# Altium PCB Microphone Breakout Board.PcbDoc (part 1 of 2)
Units mm, origin at the board's own origin, x right, y up, seen from the top; angles counter-clockwise.
Board outline 50 x 68.07 mm, 2 copper layers (Top Layer, Bottom Layer), stack 1.448 mm thick; 111 components, 81 nets, 324 pads, 44 vias.
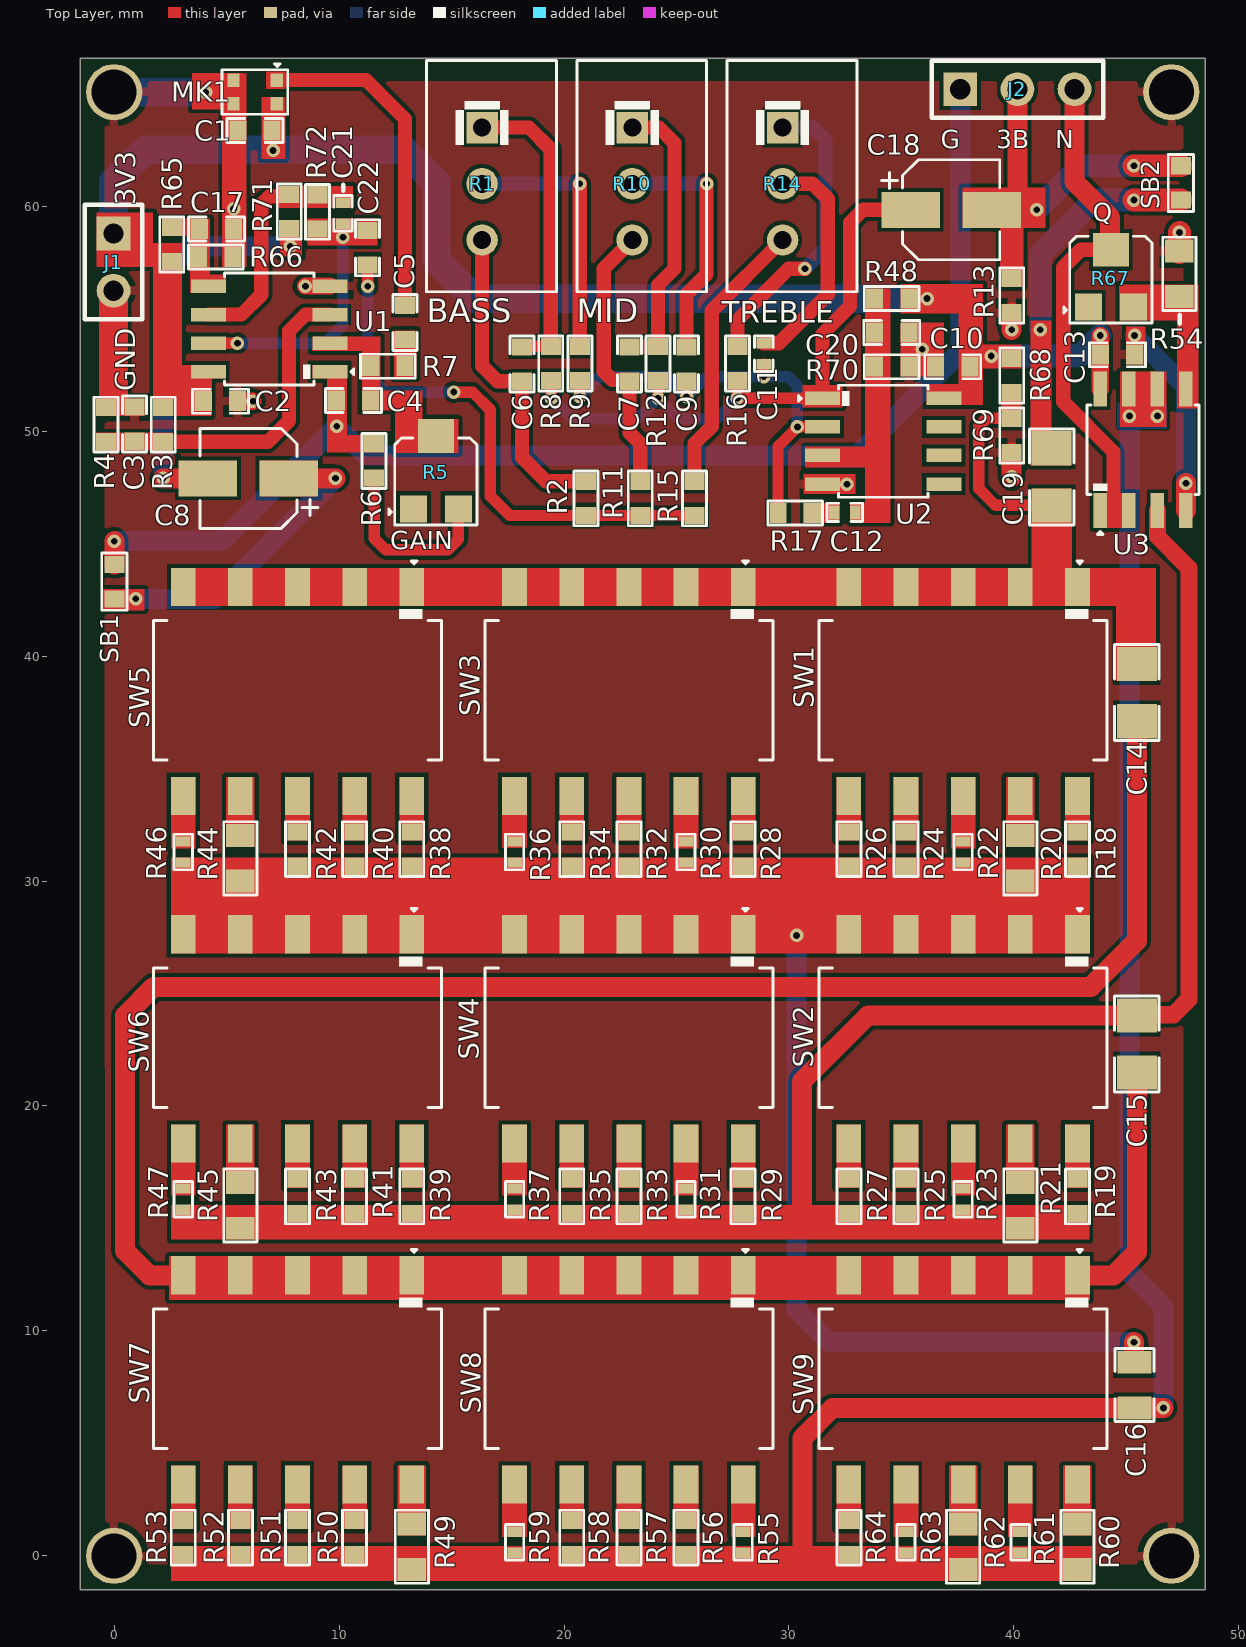
[diagram p0: Top Layer view]
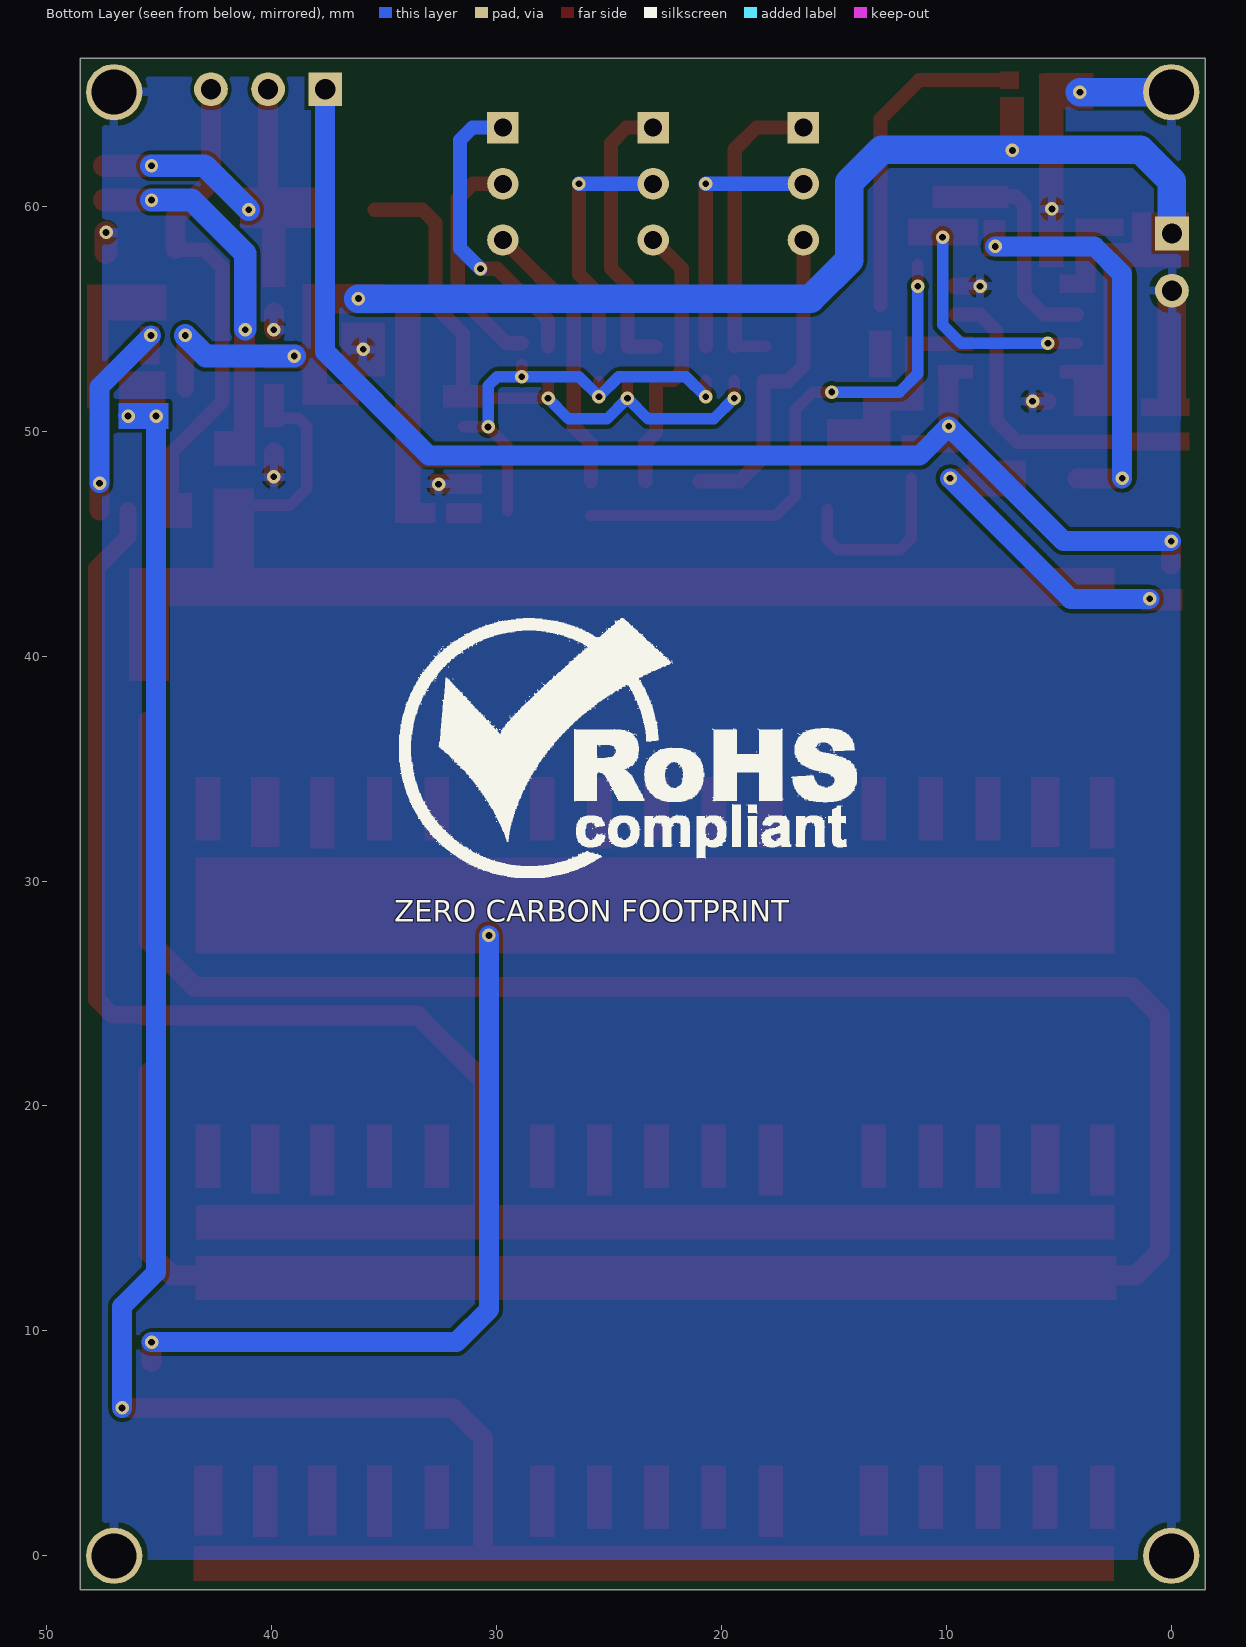
[diagram p1: Bottom Layer view, seen from below]
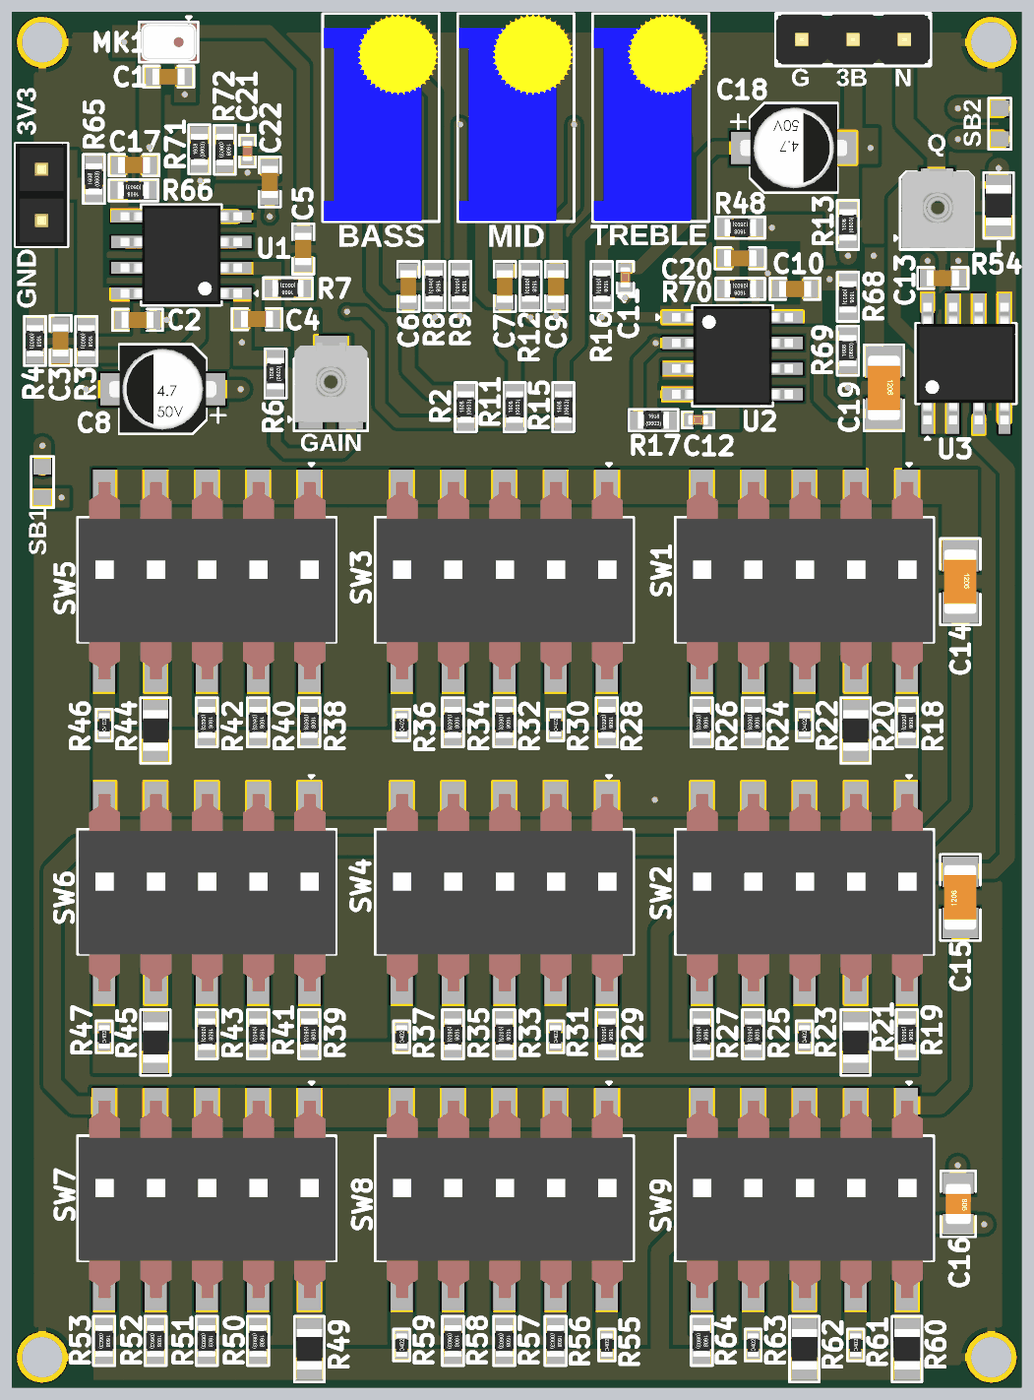
[diagram p2: 3D render of the assembled board from above, using the file's embedded part models]

## Layer stack, top to bottom
Top Solder: solder mask 0.0762, Solder Resist, Dk 3.5
Top Layer: signal copper 0.254
Dielectric 1: dielectric 0.9398, FR-4, Dk 4.8
Bottom Layer: signal copper 0.254
Bottom Solder: solder mask 0.0762, Solder Resist, Dk 3.5

## Board outline
-1.5,-1.5 -1.5,66.572 48.5,66.572 48.5,-1.5

## Design rules (kind name [scope] priority, off if disabled: settings)
Clearance [All] p1: gap=0.178 ignorepadtopadclearanceinfootprint=FALSE
ComponentClearance [All] p1: gap=0.178 collisioncheckmode=3 verticalgap=0.178 showdistances=FALSE
HoleToHoleClearance [All] p1: gap=0.178 allowstackedmicrovias=TRUE
MinimumSolderMaskSliver [All] p1: minsoldermaskwidth=0
PolygonConnect [All] p1: connectstyle=Relief reliefconductorwidth=0.381 reliefentries=4 polygonreliefangle="90 Angle" airgapwidth=0.254
RoutingVias [All] p1: holewidth=0.3 width=0.6 viastyle="Through Hole" minholewidth=0.3 minwidth=0.6 maxholewidth=0.8 maxwidth=1.6
SilkToSilkClearance [All] p1: silktosilkclearance=0
SilkToSolderMaskClearance [IsPad] p1: minsilkscreentomaskgap=0 clearancetoexposedcopper=TRUE
SolderMaskExpansion [All] p1: expansion=0.102 istentingtop=FALSE
UnRoutedNet [All] p1: checkbadconnections=TRUE
Width [All] p1: maxlimit=1.27 minlimit=0.254 preferedwidth=0.508 minimp=50.000000 maximp=50.000000 favimp=50.000000
24 further rules are at their usual default settings.

## Classes and differential pairs
component class U_Notch_Filter: C13 C14 C15 C16 C19 R18 R19 R20 R21 R22 R23 R24 R25 R26 R27 R28 R29 R30 R31 R32 R33 R34 R35 R36 R37 R38 R39 R40 R41 R42 R43 R44 R45 R46 R49 R50 R51 R52 R53 R54 R55 R56 R57 R58 R59 R60 R61 R62 R63 R64 R67 R68 R69 SW1 SW2 SW3 SW4 SW5 SW6 SW7 SW8 SW9 U3
component class U_Gain: C1 C2 C3 C4 C5 J1 J2 MK1 R3 R4 R5 R6 R7 SB1 U1
component class U_3_Band_Filter: C6 C7 C8 C9 C10 C11 C12 C17 C18 C20 C21 C22 R1 R2 R8 R9 R10 R11 R12 R13 R14 R15 R16 R17 R48 R65 R66 R70 R71 R72 SB2 U2

## Components (designator, comment, footprint, x,y, rotation, side; value= is the part's Value field where it differs from the comment)
C1 "0.1uF" CAP-0603 6.263,63.365 r180 top locked
C2 "0.1uF" CAP-0603 4.723,51.332 r0 top locked
C3 "1uF" Cap-0603 0.913,50.316 r270 top locked
C4 "47pF" Cap-0603 10.637,51.369 r180 top locked
C5 "1uF" Cap-0603 12.929,54.839 r270 top locked
C6 "47nF" Cap-0603 18.134,52.983 r90 top locked
C7 "4.7nF" Cap-0603 22.909,52.983 r270 top locked
C8 "10uF" RVT1E100M0405_ 5.971,47.903 r180 top locked
C9 "22nF" Cap-0603 25.449,52.983 r270 top locked
C10 "0.1uF" CAP-0603 37.282,52.865 r180 top locked
C11 "4.2nF" Cap-0402 28.877,53.44 r270 top locked
C12 "1.2nF" Cap-0402 32.481,46.386 r0 top locked
C13 "0.1uF" CAP-0603 44.601,53.4 r0 top locked
C14 "0.1uF" Cap-1206 45.465,38.378 r270 top locked
C15 "0.1uF" Cap-1206 45.465,22.757 r90 top locked
C16 "0.2uF" Cap-0805 45.363,7.593 r270 top locked
C17 "1uF" Cap-0603 4.545,58.988 r180 top locked
C18 "10uF" RVT1E100M0405_ 37.213,59.841 r0 top locked
C19 "4.7uF" Cap-1206 41.68,47.969 r270 top locked
C20 "1uF" Cap-0603 34.568,54.38 r180 top locked
C21 "33pF" Cap-0402 10.17,59.688 r270 top locked
C22 "2.2uF" Cap-0603 11.27,58.154 r270 top locked
J1 "22284020" HDR1X2_ -0.027,58.786 r270 top locked
J2 "C49257" HDR1X3_ 37.616,65.204 r0 top locked
MK1 "ZTS6117" ZTS6117_ 6.267,65.079 r270 top locked
R1 "100k" 3296W_ 16.356,60.999 r270 top locked
R2 "10K" Res-0603 20.979,47.014 r270 top locked value=10kR
R3 "10K" Res-0603 2.183,50.291 r90 top locked value=10kR
R4 "10K" Res-0603 -0.357,50.291 r90 top locked value=10kR
R5 "500k" VG039NCHXTB504_ 14.299,48.165 r0 top locked
R6 "1K" Res-0603 11.559,48.678 r270 top locked
R7 "10K" Res-0603 12.169,52.888 r0 top locked value=10kR
R8 "10K" Res-0603 19.411,53.008 r90 top locked value=10kR
R9 "10K" Res-0603 20.704,53.008 r90 top locked value=10kR
R10 "100k" 3296W_ 23.036,60.999 r270 top locked
R11 "3.3k" Res-0603 23.392,47.014 r270 top locked
R12 "3.3k" Res-0603 24.179,53.008 r90 top locked
R13 "22K" Res-0603 39.902,56.031 r270 top locked
R14 "500k" 3296W_ 29.717,60.999 r270 top locked
R15 "1.8K" Res-0603 25.805,47.014 r270 top locked
R16 "1.8K" Res-0603 27.71,53.008 r90 top locked
R17 "270R" Res-0603 30.273,46.367 r180 top locked
R18 "80K" Res-0603 42.823,31.418 r90 top locked
R19 "80K" Res-0603 42.823,15.984 r90 top locked
R20 "40K" RES-0805 40.283,31.012 r90 top locked
R21 "40K" RES-0805 40.283,15.578 r90 top locked
R22 "27K" Res-0402 37.743,31.291 r90 top locked
R23 "27K" Res-0402 37.743,15.857 r90 top locked
R24 "20K" Res-0603 35.203,31.418 r90 top locked
R25 "20K" Res-0603 35.203,15.984 r90 top locked
R26 "16K" Res-0603 32.663,31.418 r90 top locked
R27 "16K" Res-0603 32.663,15.984 r90 top locked
R28 "8.2K" Res-0603 27.964,31.418 r90 top locked value=8.2kR
R29 "8.2K" Res-0603 27.964,15.984 r90 top locked value=8.2kR
R30 "4.02K" Res-0402 25.424,31.291 r90 top locked
R31 "4.02K" Res-0402 25.424,15.857 r90 top locked
R32 "2.7K" Res-0603 22.884,31.418 r90 top locked
R33 "2.7K" Res-0603 22.884,15.984 r90 top locked
R34 "2K" Res-0603 20.344,31.418 r90 top locked
R35 "2K" Res-0603 20.344,15.984 r90 top locked
R36 "1.6K" Res-0402 17.804,31.291 r90 top locked
R37 "1.6K" Res-0402 17.804,15.857 r90 top locked
R38 "1.3K" Res-0603 13.232,31.418 r90 top locked
R39 "1.3K" Res-0603 13.232,15.984 r90 top locked
R40 "1.1K" Res-0603 10.692,31.418 r90 top locked
R41 "1.1K" Res-0603 10.692,15.984 r90 top locked
R42 "1K" Res-0603 8.152,31.418 r90 top locked
R43 "1K" Res-0603 8.152,15.984 r90 top locked
R44 "900R" RES-0805 5.612,31.012 r90 top locked
R45 "900R" RES-0805 5.612,15.578 r90 top locked
R46 "806R" Res-0402 3.072,31.291 r90 top locked
R47 "806R" Res-0402 3.072,15.857 r90 top locked
R48 "10K" Res-0603 34.568,55.895 r0 top locked value=10kR
R49 "40K" RES-0805 13.232,0.405 r90 top locked
R50 "20K" Res-0603 10.692,0.811 r90 top locked
R51 "13.3K" Res-0603 8.152,0.811 r90 top locked
R52 "10K" Res-0603 5.612,0.811 r90 top locked value=10kR
R53 "8.2K" Res-0603 3.072,0.811 r90 top locked value=8.2kR
R54 "98K" RES-0805 47.357,56.996 r90 top
R55 "4.02K" Res-0402 27.964,0.608 r90 top locked
R56 "2K" Res-0603 25.424,0.811 r90 top locked
R57 "1.3K" Res-0603 22.884,0.811 r90 top locked
R58 "1K" Res-0603 20.344,0.811 r90 top locked
R59 "806R" Res-0402 17.804,0.608 r90 top locked
R60 "649R" RES-0805 42.823,0.405 r90 top locked
R61 "549R" Res-0402 40.283,0.608 r90 top locked
R62 "500R" RES-0805 37.743,0.405 r90 top locked
R63 "453R" Res-0402 35.203,0.608 r90 top locked
R64 "402R" Res-0603 32.663,0.811 r90 top locked
R65 "10K" Res-0603 2.564,58.302 r270 top locked value=10kR
R66 "10K" Res-0603 4.52,57.743 r0 top locked value=10kR
R67 "100k" TC33X-2-104E_ 43.309,55.513 r0 top locked
R68 "10K" Res-0603 39.902,52.475 r90 top locked value=10kR
R69 "10K" Res-0603 39.902,49.808 r270 top locked value=10kR
R70 "10K" Res-0603 34.568,52.865 r0 top locked value=10kR
R71 "47K" Res-0603 7.784,59.765 r270 top locked
R72 "47K" Res-0603 9.04,59.75 r90 top locked
SB1 "Solder Bridge" "Solder Bridge" 0.01,43.307 r270 top locked
SB2 "Solder Bridge" "Solder Bridge" 47.422,61.036 r270 top locked
SW1 "DSIC05LS-P" DSIC05LS-P_ 37.743,38.427 r270 top locked
SW2 "DSIC05LS-P" DSIC05LS-P_ 37.743,22.986 r270 top locked
SW3 "DSIC05LS-P" DSIC05LS-P_ 22.884,38.427 r270 top locked
SW4 "DSIC05LS-P" DSIC05LS-P_ 22.884,22.986 r270 top locked
SW5 "DSIC05LS-P" DSIC05LS-P_ 8.152,38.427 r270 top locked
SW6 "DSIC05LS-P" DSIC05LS-P_ 8.152,22.986 r270 top locked
SW7 "DSIC05LS-P" DSIC05LS-P_ 8.152,7.82 r270 top locked
SW8 "DSIC05LS-P" DSIC05LS-P_ 22.884,7.82 r270 top locked
SW9 "DSIC05LS-P" DSIC05LS-P_ 37.743,7.82 r270 top locked
U1 "LM2904DT" SOIC-8 6.892,54.547 r180 top locked
U2 "LM2904DT" SOIC-8 34.187,49.554 r0 top locked
U3 "LM2904DT" SOIC-8 45.744,49.173 r90 top locked

## Footprints (in the part's own frame and the unit in brackets; to place one, negate y for a bottom-side part, rotate by r counter-clockwise, add the part's x,y. Pads: shape width x height; smd on the part's side, far side on the other; paste and mask are expansions set on the pad)
3296W_ [mm]
  rect 1.4x1.4 hole 0.8: 1(-2.5,0)
  round 1.4 hole 0.8: 2(0,0) 3(2.5,0)
  silkscreen extent -5.49,-2.46 4.8,3.3, body extent -5.47,-2.41 4.76,3.27, height 18.03
Cap-0402 [mil]
  rect 18x25 smd mask+2.36: 1(-18.5,0) 2(18.5,0)
  silkscreen extent -31,-16 31,16, body extent -20,-10 20,10, height 19
CAP-0603 [mil]
  rect 30x35 smd mask+2.36: 1(-30,0) 2(30,0)
  silkscreen extent -49,-21 49,21, body extent -32,-16 31,16, height 34
Cap-0603 [mil]
  rect 30x35 smd mask+2.36: 1(-30,0) 2(30,0)
  silkscreen extent -49,-21 49,21, body extent -32,-16 31,16, height 34
Cap-0805 [mil] "SMD 0805"
  rect 40x60 smd mask+2.76: 1(-40,0) 2(40,0)
  silkscreen extent -64,-34 64,34, body extent -39,-25 39,25, height 30
Cap-1206 [mil] "SMD 1206"
  rect 60x70 smd: 1(-50,0) 2(50,0)
  silkscreen extent -84,-39 84,39, body extent -63,-31 63,32, height 39
DSIC05LS-P_ [mm]
  rect 1.7x1.1 smd: 1(-4.65,5.08) 2(-4.65,2.54) 3(-4.65,0) 4(-4.65,-2.54) 5(-4.65,-5.08) 6(4.65,-5.08) 7(4.65,-2.54) 8(4.65,0) 9(4.65,2.54) 10(4.65,5.08)
  silkscreen extent -5.8,-6.4 3.05,6.4, body extent -4.88,-6.33 4.88,6.37, height 4.15
HDR1X2_ [mm] "CONN HEADER VERT 2POS 2.54MM"
  rect 1.5x1.5 hole 0.9: 1(0,0)
  round 1.5 hole 0.9: 2(2.54,0)
  silkscreen extent -1.27,-1.27 3.81,1.27, body extent -1.27,-1.27 3.81,1.27, height 8.44
HDR1X3_ [mm] "Connector; Header; 3 Position"
  rect 1.5x1.5 hole 0.9: 1(0,0)
  round 1.5 hole 0.9: 2(2.54,0) 3(5.08,0)
  silkscreen extent -1.27,-1.27 6.35,1.27, body extent -1.27,-1.24 6.35,1.25, height 8.54
Res-0402 [mil]
  rect 18x25 smd mask+2.17: 1(-18.5,0) 2(18.5,0)
  silkscreen extent -32,-17 32,16, body extent -23,-11 23,11, height 16
Res-0603 [mil]
  rect 30x35 smd: 1(-30,0) 2(30,0)
  silkscreen extent -48,-21 48,21, body extent -31,-17 31,17, height 18
RES-0805 [mil] "SMD 0805"
  rect 40x50 smd: 1(-40,0) 2(40,0)
  silkscreen extent -64,-29 64,29, body extent -39,-25 39,24, height 24
RVT1E100M0405_ [mm] "10uF 25V 5.4mm SMD"
  rect 2.6x1.6 smd: 1(-1.8,0) 2(1.8,0)
  silkscreen extent -3.1,-2.22 2.16,2.22, body extent -2.65,-2.15 2.65,2.15, height 5.7
SOIC-8 [mm]
  rect 1.55x0.6 smd: 1(-2.7,1.905) 2(-2.7,0.635) 3(-2.7,-0.635) 4(-2.7,-1.905) 5(2.7,-1.905) 6(2.7,-0.635) 7(2.7,0.635) 8(2.7,1.905)
  silkscreen extent -3.76,-2.49 1.99,2.49, body extent -3,-2.45 3,2.45, height 1.7
"Solder Bridge" [mil] "Solder Bridge ON"
  rect 30x35 smd: 1(-30,0) 2(30,0)
  silkscreen extent -50,-22 50,22
TC33X-2-104E_ [mm]
  rect 1.2x1.2 smd: 1(0,0) 3(2,0)
  rect 1.6x1.5 smd: 2(1,2.55)
  silkscreen extent -1.09,-0.71 2.83,3.15, body extent -0.76,-0.64 2.84,3.32, height 1.13
VG039NCHXTB504_ [mm]
  rect 1.2x1.2 smd: 1(-1,-1.625) 3(1,-1.625)
  rect 1.6x1.5 smd: 2(0,1.625)
  silkscreen extent -2.09,-2.33 1.83,1.53, body extent -1.8,-1.91 1.8,2.05, height 1.13
ZTS6117_ [mm]
  rect 0.6x0.54 smd: 1(-0.525,0.965) 2(-0.525,-0.965) 3(0.525,-0.965) 4(0.525,0.965)
  silkscreen extent -1.25,-1.47 0.99,1.45, body extent -0.92,-1.38 0.93,1.38, height 0.9

## Part data
C1 C2 C10 C13: library part CL10B104KB8NNNL, "CAP CER 0.1UF 50V X7R 0603", Capacitance=100nF, Case/Package=0603, Dielectric=X7R, LCSC Part Number=C913912, Manufacturer=Samsung, Max Operating Temperature=125°C, Min Operating Temperature=-55°C, Package Quantity=15000, Supplier Part Number 1=1276-CL10B104KB8NNNLCT-ND, Tolerance=10%, Voltage Rating=50V, ComponentLink1Description=https://www.verical.com/server-webapp/html/getDatasheet?partID=357523&src-supplier=Verical, ComponentLink1URL=https://www.verical.com/server-webapp/html/getDatasheet?partID=357523&src-supplier=Verical, ComponentLink2Description=https://media.digikey.com/pdf/Data%20Sheets/Samsung%20PDFs/CL_Series_MLCC_ds.pdf?src-supplier=Digi-Key, ComponentLink2URL=https://media.digikey.com/pdf/Data%20Sheets/Samsung%20PDFs/CL_Series_MLCC_ds.pdf?src-supplier=Digi-Key, Construction=Flat, Depth=0.8mm, Height=0.8mm, Length=1.6mm, Manufacturer Part Number=CL10B104KB8NNNL, Mount="Surface Mount", Packaging="Tape and Reel", Pricing 1="1=0.1, 10=0.03, 50=0.0164, 100=0.0134, 500=0.00958, 1000=0.00753, 2500=0.00684, 5000=0.0063 (USD)", Radiation Hardening=No, RoHS Compliant=Yes, Series=CL, Stock 1=3731229, Supplier 1=Digi-Key, Thickness=0.035inch, Voltage Rating (DC)=50V, Width=0.031inch
C3 C5 C17 C20: library part UMK107AB7105KA-T, "CAP CER 1UF 50V X7R 0603", Case Code (Imperial)=0603, Case Code (Metric)=1608, Dielectric=X7R, LCSC Part Number=C105174, Manufacturer="Taiyo Yuden", Max Operating Temperature=125°C, Min Operating Temperature=-55°C, Package Quantity=1, Supplier Part Number 1=587-3247-1-ND, Tolerance=10%, Voltage Rating=50V, Capacitance=1uF, Case/Package=0603, ComponentLink1Description=http://www.farnell.com/datasheets/2048165.pdf?src-supplier=Element14, ComponentLink1URL=http://www.farnell.com/datasheets/2048165.pdf?src-supplier=Element14, ComponentLink2Description=https://www.murata.com/~/media/webrenewal/support/library/catalog/products/capacitor/mlcc/c02e.ashx?la=en-us&src-supplier=Digi-Key, ComponentLink2URL=https://www.murata.com/~/media/webrenewal/support/library/catalog/products/capacitor/mlcc/c02e.ashx?la=en-us&src-supplier=Digi-Key, ComponentLink3Description=https://www.yuden.co.jp/productdata/catalog/mlcc_all_e.pdf?src-supplier=Digi-Key, ComponentLink3URL=https://www.yuden.co.jp/productdata/catalog/mlcc_all_e.pdf?src-supplier=Digi-Key, ComponentLink4Description=https://www.yuden.co.jp/productdata/catalog/mlcc_all_e.pdf?src-supplier=Onlinecomponents.com, ComponentLink4URL=https://www.yuden.co.jp/productdata/catalog/mlcc_all_e.pdf?src-supplier=Onlinecomponents.com, Depth=0.8mm, Halogen Free="Halogen Free", Height=0.8mm, Item Type=Capacitor, Length=1.6mm, Manufacturer Part Number=UMK107AB7105KA-T, Mount="Surface Mount", Packaging="Tape and Reel", Pricing 1="1=0.28, 10=0.19, 100=0.1079, 500=0.0762, 1000=0.0667 (USD)", Radiation Hardening=No, Stock 1=453098, Supplier 1=Digi-Key, Termination=SMD/SMT, Thickness=0.037inch, Voltage Rating (DC)=50V, Width=0.031inch
C4: library part AC0603JRNPO0BN470, "CAP CER 47PF 100V NPO 0603", Case Code (Imperial)=0603, Case Code (Metric)=1608, Case/Package=TO-236-3, LCSC Part Number=C389107, Manufacturer=Yageo, Max Operating Temperature=125°C, Max Power Dissipation=250mW, Min Operating Temperature=-55°C, Ratings=AEC-Q200, Supplier Part Number 1=311-3086-1-ND, Tolerance=6.06%, Voltage Rating=100V, Zener Voltage=33V, Capacitance=47pF, ComponentLink1Description=http://www.yageo.com/NewPortal/_en/search/productDocs.jsp?YageoPartNumber=AC0603JRNPO0BN470&src-supplier=Digi-Key, ComponentLink1URL=http://www.yageo.com/NewPortal/_en/search/productDocs.jsp?YageoPartNumber=AC0603JRNPO0BN470&src-supplier=Digi-Key, Impedance=80R, Item Type=Capacitor, Manufacturer Part Number=AC0603JRNPO0BN470, Mount="Surface Mount", Packaging="Tape and Reel", Pricing 1="1=0.16, 10=0.115, 100=0.0542, 500=0.03798, 1000=0.03144 (USD)", Stock 1=4954, Supplier 1=Digi-Key
C6: library part CGA3E2X8R1H473M080AA, "CAP CER 0.047UF 50V X8R 0603", Case Code (Imperial)=0603, Case Code (Metric)=1608, Dielectric=X8R, LCSC Part Number=C2172709, Manufacturer=TDK, Max Operating Temperature=150°C, Min Operating Temperature=-55°C, Package Quantity=4000, Ratings=AEC-Q200, Supplier Part Number 1=445-12603-1-ND, Tolerance=20%, Voltage Rating=50V, Capacitance=47nF, Case/Package=0603, Category="Ceramic Capacitors", ComponentLink1Description=http://www.mouser.com/ds/2/400/mlcc_automotive_hightemp_en-520039.pdf?src-supplier=Mouser, ComponentLink1URL=http://www.mouser.com/ds/2/400/mlcc_automotive_hightemp_en-520039.pdf?src-supplier=Mouser, ComponentLink2Description=https://product.tdk.com/info/en/catalog/spec/mlccspec_automotive_hightemp_en.pdf?src-supplier=Digi-Key, ComponentLink2URL=https://product.tdk.com/info/en/catalog/spec/mlccspec_automotive_hightemp_en.pdf?src-supplier=Digi-Key, ComponentLink3Description=http://product.tdk.com/en/catalog/datasheets/mlcc_automotive_hightemp_en.pdf?src-supplier=Avnet, ComponentLink3URL=http://product.tdk.com/en/catalog/datasheets/mlcc_automotive_hightemp_en.pdf?src-supplier=Avnet, Features="High Temperature", Height=0.8mm, Length=0.063inch, Manufacturer Part Number=CGA3E2X8R1H473M080AA, Mount="Surface Mount", Packaging="Tape and Reel", Pricing 1="1=0.16000, 10=0.11200, 50=0.06360, 100=0.05260, 500=0.03690, 1000=0.03055 (USD)", RoHS=Yes, Stock 1=1279, Supplier 1=Digi-Key, Thickness=0.035inch, Voltage Rating (DC)=50V, Weight=7.1E-05oz, Width=0.031inch
C7: library part CC0603JRNPO9BN472, "CAP CER 4700PF 50V C0G/NPO 0603", LCSC Part Number=C576818, Manufacturer=Yageo, Supplier Part Number 1=13-CC0603JRNPO9BN472CT-ND, Category="Ceramic Capacitors", ComponentLink1Description=LCSC, ComponentLink1URL=https://www.lcsc.com/product-detail/Multilayer-Ceramic-Capacitors-MLCC-SMD-SMT_YAGEO-CC0603JRNPO9BN472_C576818.html, Item Type=Capacitor, Manufacturer Part Number=CC0603JRNPO9BN472, Pricing 1="1=0.48000, 10=0.33000, 50=0.23100, 100=0.19800, 500=0.14854, 1000=0.12543 (USD)", RoHS=Yes, RoHS Compliant=Yes, Stock 1=31779, Supplier 1=Digi-Key
C8 C18: library part RVT1E100M0405, "CAP ALUM 10uF 25V SMD", LCSC Part Number=C970655, Manufacturer=ROQANG, Operating Temperature=-45℃~+105℃, Rated Voltage=25V, Tolerance=±20%, Capacitance=10uF, ComponentLink1Description=LCSC, ComponentLink1URL=https://www.lcsc.com/product-detail/Aluminum-Electrolytic-Capacitors-SMD_10uF-25V-20_C72484.html, Item Type=Capacitor, L=5.4mm, Manufacturer Part Number=RVT1E100M0405, φD=4mm
C9: library part CGA3E2X7R2A223K080AA, "CAP CER 0.022UF 100V X7R 0603", Case Code (Imperial)=0603, Case Code (Metric)=1608, Dielectric=X7R, LCSC Part Number=C2167165, Manufacturer=TDK, Max Operating Temperature=125°C, Min Operating Temperature=-55°C, Package Quantity=1, Ratings=AEC-Q200, Resistor Type=Ceramic, Supplier Part Number 1=445-5814-1-ND, Tolerance=10%, Voltage Rating=100V, Capacitance=22nF, Case/Package=0603, Category="Ceramic Capacitors", ComponentLink1Description=https://datasheet.ciiva.com/22725/1735406-22725648.pdf?src-supplier=Element14, ComponentLink1URL=https://datasheet.ciiva.com/22725/1735406-22725648.pdf?src-supplier=Element14, ComponentLink2Description=https://datasheet.ciiva.com/24218/cga3e2x7r2a223k080aa-266292-24218959.pdf?src-supplier=Mouser, ComponentLink2URL=https://datasheet.ciiva.com/24218/cga3e2x7r2a223k080aa-266292-24218959.pdf?src-supplier=Mouser, ComponentLink3Description=https://datasheet.ciiva.com/7975/1807242-7975349.pdf?src-supplier=Element14, ComponentLink3URL=https://datasheet.ciiva.com/7975/1807242-7975349.pdf?src-supplier=Element14, Depth=0.8mm, Height=0.8mm, Length=1.6mm, Manufacturer Part Number=CGA3E2X7R2A223K080AA, Mount="Surface Mount", Packaging="Tape and Reel", Pricing 1="1=0.11000, 10=0.07600, 50=0.04340, 100=0.03590, 500=0.02516, 1000=0.02083 (USD)", REACH SVHC="No SVHC", RoHS=Yes, RoHS Compliant=Yes, Series=CGA, Stock 1=56079, Supplier 1=Digi-Key, Termination=SMD/SMT, Thickness=0.035inch, Voltage Rating (DC)=100V, Weight=7.1E-05oz, Width=0.031inch
C11: library part GCM155R72A472KA01D, "100V 4.2nF X7R ±10% 0402 Multilayer Ceramic Capacitors MLCC - SMD/SMT ROHS", LCSC Part Number=C2980803, Manufacturer="Murata Electronics", ComponentLink1Description=LCSC, ComponentLink1URL=https://www.lcsc.com/product-detail/Multilayer-Ceramic-Capacitors-MLCC-SMD-SMT_Murata-Electronics-GCM155R72A472KA01D_C2980803.html, Item Type=Capacitor, Manufacturer Part Number=GCM155R72A472KA01D
C12: library part C0402C122K3RAC7867, "CAP CER 1200PF 25V X7R 0402", Case/Package=0402, Dielectric=X7R, Dielectric Material=Ceramic, LCSC Part Number=C3895723, Manufacturer=KEMET, Max Operating Temperature=125°C, Min Operating Temperature=-55°C, Supplier Part Number 1=399-14419-1-ND, Tolerance=10%, Voltage Rating (DC)=25V, Capacitance=1.2nF, Construction=Flat, Contact Plating=Tin,Matte, Depth=0.5mm, Height=0.5mm, Length=1mm, Manufacturer Part Number=C0402C122K3RAC7867, Mount="Surface Mount", Packaging="Tape and Reel", Pricing 1="1=0.38, 10=0.266, 50=0.1864, 100=0.1597, 500=0.1198, 1000=0.10117, 2500=0.09584, 5000=0.09052 (USD)", Radiation Hardening=No, RoHS Compliant=Yes, Stock 1=13198, Supplier 1=Digi-Key
C14 C15: library part GRM31C5C1H104FA01L, "50V 100nF C0G ±1% 1206 Multilayer Ceramic Capacitors MLCC - SMD/SMT ROHS", LCSC Part Number=C2981728, Manufacturer="Murata Electronics", ComponentLink1Description=LCSC, ComponentLink1URL=https://www.lcsc.com/product-detail/Multilayer-Ceramic-Capacitors-MLCC-SMD-SMT_Murata-Electronics-GRM31C5C1H104FA01L_C2981728.html, Item Type=Capacitor, Manufacturer Part Number=GRM31C5C1H104FA01L
C16: library part NL0805B204K500CPBN, "50V 200nF ±10% 0805 Multilayer Ceramic Capacitors MLCC - SMD/SMT ROHS", LCSC Part Number=C918135, Manufacturer="HUI JU", ComponentLink1Description=LCSC, ComponentLink1URL=https://www.lcsc.com/product-detail/Multilayer-Ceramic-Capacitors-MLCC-SMD-SMT_HUI-JU-NL0805B204K500CPBN_C918135.html, Item Type=Capacitor, Manufacturer Part Number=NL0805B204K500CPBN
C19: library part C3216X7R1H475K160AC, "CAP CER 4.7UF 50V X7R 1206", Case Code (Imperial)=1206, Case Code (Metric)=3216, Dielectric=X7R, Dielectric Material=Ceramic, LCSC Part Number=C2167787, Manufacturer=TDK, Max Operating Temperature=125°C, Min Operating Temperature=-55°C, Package Quantity=1, Supplier Part Number 1=445-8032-1-ND, Tolerance=10%, Voltage Rating=50V, Capacitance=4.7uF, Case/Package=1206, ComponentLink1Description=https://product.tdk.com/info/en/catalog/datasheets/mlcc_commercial_general_en.pdf?src-supplier=Digi-Key, ComponentLink1URL=https://product.tdk.com/info/en/catalog/datasheets/mlcc_commercial_general_en.pdf?src-supplier=Digi-Key, ComponentLink2Description=http://www.mouser.com/ds/2/400/lcc_commercial_general_en-560200.pdf?src-supplier=Mouser, ComponentLink2URL=http://www.mouser.com/ds/2/400/lcc_commercial_general_en-560200.pdf?src-supplier=Mouser, ComponentLink3Description=http://product.tdk.com/capacitor/mlcc/en/documents/mlcc_commercial_general_en.pdf?src-supplier=Future+Electronics, ComponentLink3URL=http://product.tdk.com/capacitor/mlcc/en/documents/mlcc_commercial_general_en.pdf?src-supplier=Future+Electronics, Depth=1.6mm, Lead Free="Lead Free", Length=3.2mm, Manufacturer Part Number=C3216X7R1H475K160AC, Mount="Surface Mount", Packaging="Tape and Reel", Pricing 1="1=0.76, 10=0.535, 50=0.4042, 100=0.3521, 500=0.26082, 1000=0.2217 (USD)", REACH SVHC="No SVHC", Resistor Type=Ceramic, RoHS Compliant=Yes, Series=C, Stock 1=93848, Supplier 1=Digi-Key, Termination=SMD/SMT, Thickness=1.6mm, Voltage Rating (DC)=50V, Weight=0.000571oz, Width=0.063inch
C21: library part GRM1555C1E330JA01D, "CAP CER 33PF 25V C0G/NP0 0402", Case Code (Imperial)=0402, Case Code (Metric)=1005, Dielectric=C0G, LCSC Part Number=C441758, Manufacturer=Murata, Max Operating Temperature=125°C, Min Operating Temperature=-55°C, Package Quantity=1, Supplier Part Number 1=490-6177-1-ND, Tolerance=5%, Voltage=25V, Capacitance=33pF, Case/Package=0402, ComponentLink1Description=https://www.murata.com/~/media/webrenewal/support/library/catalog/products/capacitor/mlcc/c02e.ashx?la=en-us&src-supplier=Digi-Key, ComponentLink1URL=https://www.murata.com/~/media/webrenewal/support/library/catalog/products/capacitor/mlcc/c02e.ashx?la=en-us&src-supplier=Digi-Key, ComponentLink2Description=http://www.mouser.com/ds/2/281/c02e-2905.pdf?src-supplier=Mouser, ComponentLink2URL=http://www.mouser.com/ds/2/281/c02e-2905.pdf?src-supplier=Mouser, ComponentLink3Description=http://psearch.murata.com/capacitor/product/GRM1555C1E330JA01%23.pdf?src-supplier=Avnet, ComponentLink3URL=http://psearch.murata.com/capacitor/product/GRM1555C1E330JA01%23.pdf?src-supplier=Avnet, Construction=Flat, Depth=0.5mm, Height=0.5mm, Lead Free="Lead Free", Length=1mm, Manufacturer Part Number=GRM1555C1E330JA01D, Mount="Surface Mount", Packaging="Tape and Reel", Pricing 1="1=0.1, 10=0.034, 50=0.0184, 100=0.0151, 500=0.01078, 1000=0.00847, 2500=0.0077, 5000=0.00708 (USD)", Radiation Hardening=No, RoHS Compliant=Yes, Series=GRM, Stock 1=250773, Supplier 1=Digi-Key, Termination=SMD/SMT, Thickness=0.022inch, Voltage Rating=25V, Voltage Rating (DC)=25V, Width=0.02inch
C22: library part GRM188R6YA225KA12D, "CAP, 2.2µF, 35V, 10%, X5R, 0603", Case Code (Imperial)=0603, Case Code (Metric)=1608, Dielectric=X5R, LCSC Part Number=C86017, Manufacturer=Murata, Max Operating Temperature=85°C, Min Operating Temperature=-55°C, Package Quantity=4000, Supplier Part Number 1=490-7204-1-ND, Tolerance=10%, Voltage=35V, Capacitance=2.2uF, Case/Package=0603, Category="Ceramic Capacitors", ComponentLink1Description=https://datasheet.ciiva.com/14906/partnumbering-e-01-14906490.pdf?src-supplier=Digi-Key, ComponentLink1URL=https://datasheet.ciiva.com/14906/partnumbering-e-01-14906490.pdf?src-supplier=Digi-Key, ComponentLink2Description=https://datasheet.ciiva.com/14906/partnumbering-e-01-14906491.pdf?src-supplier=Digi-Key, ComponentLink2URL=https://datasheet.ciiva.com/14906/partnumbering-e-01-14906491.pdf?src-supplier=Digi-Key, ComponentLink3Description=https://datasheet.ciiva.com/14906/partnumbering-e-01-14906492.pdf?src-supplier=Digi-Key, ComponentLink3URL=https://datasheet.ciiva.com/14906/partnumbering-e-01-14906492.pdf?src-supplier=Digi-Key, Depth=0.8mm, Height=0.8mm, Lead Free="Lead Free", Length=1.6mm, Manufacturer Part Number=GRM188R6YA225KA12D, Material=Ceramic, Mount="Surface Mount", Packaging="Tape and Reel", Pricing 1="1=0.21000, 10=0.14100, 50=0.08480, 100=0.07170, 500=0.04904, 1000=0.04338 (USD)", REACH SVHC="No SVHC", RoHS=Yes, RoHS Compliant=Yes, Series=GRM, Stock 1=81665, Supplier 1=Digi-Key, Termination=SMD/SMT, Thickness=0.035inch, Voltage Rating=35V, Voltage Rating (DC)=35V, Weight=0.000222oz, Width=0.8mm
J1: "KK 254 Breakaway Header, Vertical, 2 Circuits, Tin (Sn) Plating, Mating Pin Length 6.09mm", Color=Black, Contact Resistance=20mR, Current Rating=4A, Flammability Rating="UL94 V-0", LCSC Part Number=C234182, Manufacturer=Molex, Manufacturer Part Number=22-28-4020, Max Operating Temperature=75°C, Max Voltage Rating (AC)=250V, Min Operating Temperature=0°C, Package Quantity=1, Supplier Part Number 1=8967620, Category="Headers and Wire Housings", ComponentLink1Description=https://datasheet.ciiva.com/1433/1596842-1433683.pdf?src-supplier=Element14, ComponentLink1URL=https://datasheet.ciiva.com/1433/1596842-1433683.pdf?src-supplier=Element14, ComponentLink2Description=https://datasheet.ciiva.com/5157/0022284020-pcb-headers-228358-5157523.pdf?src-supplier=Mouser, ComponentLink2URL=https://datasheet.ciiva.com/5157/0022284020-pcb-headers-228358-5157523.pdf?src-supplier=Mouser, ComponentLink3Description=https://datasheet.ciiva.com/30153/214440022284020-pcb-headers-30153261.pdf?src-supplier=Onlinecomponents.com, ComponentLink3URL=https://datasheet.ciiva.com/30153/214440022284020-pcb-headers-30153261.pdf?src-supplier=Onlinecomponents.com, ComponentLink4Description=https://datasheet.ciiva.com/15217/getdatasheetpartid-127875-15217702.pdf?src-supplier=Verical, ComponentLink4URL=https://datasheet.ciiva.com/15217/getdatasheetpartid-127875-15217702.pdf?src-supplier=Verical, ComponentLink5Description=https://datasheet.ciiva.com/10088/0022284020-pcb-headers-10088332.pdf?src-supplier=Avnet, ComponentLink5URL=https://datasheet.ciiva.com/10088/0022284020-pcb-headers-10088332.pdf?src-supplier=Avnet, Connector Type="Male Pin", Contact Material=Brass,Bronze, Contact Mating Length=0.24inch, Contact Plating=Tin, Contact Type="Male Pin", Depth=2.49mm, Gender=Male, Glow Wire Compliant=Non-compliant, Housing Color=Black, Housing Material=Nylon, Item Type=Header, Lead Free="Lead Free", Max Voltage Rating (DC)=250V, Mount="Through Hole", Number of Circuits=2, Number of Contacts=2, Number of Positions=2, Number of Rows=1, Orientation=Straight, Packaging=Bulk, Pitch=2.54mm, Pricing 1="50=0.06100, 150=0.05600, 250=0.05200, 500=0.04900 (GBP)", Radiation Hardening=No, RoHS=Yes, RoHS Compliant=Yes, Series="KK® 42375", Stock 1=29550, Supplier 1=Rs, Termination=Solder, Voltage Rating=250V, Voltage Rating (DC)=250V
J2: "3A Straight Square Pins -40℃~+105℃ 3 2.54mm Black 1x3P Plugin,P=2.54mm Pin Headers ROHS", Manufacturer=BOOMELE, ComponentLink1Description=LCSC, ComponentLink1URL=https://www.lcsc.com/product-detail/Pin-Headers_BOOMELE-Boom-Precision-Elec-C49257_C49257.html, Item Type=Header, LCSC Part Number=C49257, Manufacturer Part Number=C49257
MK1: "1.5V~3.6V Omnidirectional 120uA -42dB 400Ω 59dB SMD-4P,1.9x2.8mm MEMS Microphones ROHS", LCSC Part Number=C481300, Manufacturer=Zilltek, ComponentLink1Description=LCSC, ComponentLink1URL=https://www.lcsc.com/product-detail/MEMS-Microphones_ZILLTEK-ZTS6117_C481300.html, Item Type=Microphone, Manufacturer Part Number=ZTS6117
R1 R10: library part 3296W-1-104, "Trimmer, Cermet, Rest 100 Kilohms, PCB, 25 Turns, Pwr-Rtg 0.5W, 3296 Series", LCSC Part Number=C330435, Manufacturer="BOCHEN(Chengdu Guosheng Tech)", ComponentLink1Description=LCSC, ComponentLink1URL=https://www.lcsc.com/product-detail/Variable-Resistors-Potentiometers_BOCHEN-Chengdu-Guosheng-Tech-3296W-1-104_C330435.html, Item Type=Potentiometer, Manufacturer Part Number=3296W-1-104
R2 R3 R4 R7 R8 R9 R48 R52 R65 R66 R68 R69 R70: library part RT0603BRD0710KL, "RES SMD 10K OHM 0.1% 1/10W 0603", Case/Package=0603, LCSC Part Number=C95204, Manufacturer=Yageo, Max Operating Temperature=155°C, Min Operating Temperature=-55°C, Package Height=0.45mm, Package Length=1.6mm, Package Style=SMTMeter, Package Width=0.8mm, Power=100mW, Rated Temperature=70°C, Resistor Type="FIXED RESISTOR", Supplier Part Number 1=1991391P, Temperature Coefficient=25ppm/°C, Tolerance=0.1%, Working Voltage=75V, Category="Chip SMD Resistors", ComponentLink1Description=https://datasheet.ciiva.com:443/pdfs/VipMasterIC/IC/YAGO/YAGO-S-A0008510989/YAGO-S-A0008510989-1.pdf?src-supplier=IHS+Markit, ComponentLink1URL=https://datasheet.ciiva.com:443/pdfs/VipMasterIC/IC/YAGO/YAGO-S-A0008510989/YAGO-S-A0008510989-1.pdf?src-supplier=IHS+Markit, ComponentLink2Description=https://datasheet.ciiva.com/5624/pyu-rt-1-to-0-05-rohs-l-4-5624351.pdf?src-supplier=Mouser, ComponentLink2URL=https://datasheet.ciiva.com/5624/pyu-rt-1-to-0-05-rohs-l-4-5624351.pdf?src-supplier=Mouser, ComponentLink3Description=https://datasheet.ciiva.com/29721/pyu-rt-1-to-0-05-rohs-l-4-29721177.pdf?src-supplier=Digi-Key, ComponentLink3URL=https://datasheet.ciiva.com/29721/pyu-rt-1-to-0-05-rohs-l-4-29721177.pdf?src-supplier=Digi-Key, Construction=Chip, Item Type=Resistor, Manufacturer Part Number=RT0603BRD0710KL, Mounting Technology="Surface Mount", Packaging="Tape and Reel", Pins=2, Pricing 1="100=0.29800, 250=0.27800, 500=0.25900, 1000=0.23700 (GBP)", Reach SVHC Compliant=Yes, RoHS=Yes, RoHS Compliant=Yes, Stock 1=20510, Supplier 1=Rs, Technology="THIN FILM", Termination=Wraparound
R5: library part VG039NCHXTB504, "±25% 500kΩ SMD Variable Resistors/Potentiometers ROHS", LCSC Part Number=C128558, Manufacturer=HDK, ComponentLink1Description=LCSC, ComponentLink1URL=https://www.lcsc.com/product-detail/Variable-Resistors-Potentiometers_HDK-Hokuriku-Elec-Industry-VG039NCHXTB504_C128558.html, Item Type=Potentiometer, Manufacturer Part Number=VG039NCHXTB504
R6 R42 R43 R58: library part RT0603BRD071KL, "RES SMD 1K OHM 0.1% 1/10W 0603", Case Code (Imperial)=0603, Case Code (Metric)=1608, LCSC Part Number=C110776, Manufacturer=Yageo, Max Operating Temperature=125°C, Max Power Dissipation=100mW, Min Operating Temperature=-55°C, Package Quantity=5000, Resistance=1kR, Resistor Type="Thin Film", Temperature Coefficient=25ppm/°C, Voltage Rating=75V, Voltage Rating (DC)=50V, Case/Package=0603, Category="Chip SMD Resistors", ComponentLink1Description=https://datasheet.ciiva.com/11819/0900766b8079c86e-11819652.pdf?src-supplier=RSComponents, ComponentLink1URL=https://datasheet.ciiva.com/11819/0900766b8079c86e-11819652.pdf?src-supplier=RSComponents, ComponentLink2Description=https://datasheet.ciiva.com/5624/pyu-rt-1-to-0-05-rohs-l-4-5624759.pdf?src-supplier=Mouser, ComponentLink2URL=https://datasheet.ciiva.com/5624/pyu-rt-1-to-0-05-rohs-l-4-5624759.pdf?src-supplier=Mouser, ComponentLink3Description=https://datasheet.ciiva.com/29718/pyu-rt-1-to-0-05-rohs-l-4-29718010.pdf?src-supplier=Digi-Key, ComponentLink3URL=https://datasheet.ciiva.com/29718/pyu-rt-1-to-0-05-rohs-l-4-29718010.pdf?src-supplier=Digi-Key, ComponentLink4Description=https://datasheet.ciiva.com/29718/pyu-rt-1-to-0-05-rohs-l-4-29718011.pdf?src-supplier=Digi-Key, ComponentLink4URL=https://datasheet.ciiva.com/29718/pyu-rt-1-to-0-05-rohs-l-4-29718011.pdf?src-supplier=Digi-Key, Construction=Rectangular, Contact Plating=Tin,Lead, Depth=0.8mm, Features="Moisture Resistant", Height=0.022inch, Item Type=Resistor, Lead Free="Lead Free", Length=1.6mm, Manufacturer Part Number=RT0603BRD071KL, Military Standard=Not, Mount="Surface Mount", Number of Terminations=2, Packaging="Tape and Reel", Power Rating=100mW, Pricing 1="5000=0.03900, 10000=0.03450, 25000=0.03070, 50000=0.02040 (USD)", RoHS=Yes, RoHS Compliant=Yes, Series=RT, Size Code=0603, Stock 1=130000, Supplier 1="Arrow Electronics", Supplier Part Number 1=RT0603BRD071KL, Technology="THIN FILM", Termination=SMD/SMT, Width=0.031inch
R11 R12: library part RT0603BRD073K3L, "RES SMD 3.3K OHM 0.1% 1/10W 0603", Case Code (Imperial)=0603, Case Code (Metric)=1608, LCSC Part Number=C309653, Manufacturer=Yageo, Max Operating Temperature=125°C, Max Power Dissipation=100mW, Min Operating Temperature=-55°C, Package Quantity=5000, Resistance=3.3kR, Resistor Type="Thin Film", Temperature Coefficient=25ppm/°C, Tolerance=0.1%, Voltage Rating=75V, Voltage Rating (DC)=50V, Case/Package=0603, Category="Chip SMD Resistors", ComponentLink1Description=https://datasheet.ciiva.com/11814/0900766b8027bd26-11814026.pdf?src-supplier=Rs, ComponentLink1URL=https://datasheet.ciiva.com/11814/0900766b8027bd26-11814026.pdf?src-supplier=Rs, ComponentLink2Description=https://datasheet.ciiva.com/12694/pyu-rt-1-to-0-05-rohs-l-4-12694839.pdf?src-supplier=Mouser, ComponentLink2URL=https://datasheet.ciiva.com/12694/pyu-rt-1-to-0-05-rohs-l-4-12694839.pdf?src-supplier=Mouser, ComponentLink3Description=https://datasheet.ciiva.com/2585/pyu-rt-1-to-0-05-rohs-l-4-2585926.pdf?src-supplier=Digi-Key, ComponentLink3URL=https://datasheet.ciiva.com/2585/pyu-rt-1-to-0-05-rohs-l-4-2585926.pdf?src-supplier=Digi-Key, Construction=Rectangular, Contact Plating=Tin,Lead, Depth=0.8mm, Features="Moisture Resistant", Height=0.022inch, Item Type=Resistor, Lead Free="Lead Free", Length=0.063inch, Manufacturer Part Number=RT0603BRD073K3L, Military Standard=Not, Number of Terminations=2, Packaging="Tape and Reel", Power Rating=100mW, Pricing 1="1=0.30610, 10=0.21080, 25=0.17430, 100=0.09180, 250=0.09000, 500=0.07600, 1000=0.04220 (USD)", RoHS=Yes, RoHS Compliant=Yes, Series=RT, Stock 1=2417, Supplier 1="Arrow Electronics", Supplier Part Number 1=RT0603BRD073K3L, Termination=SMD/SMT, Width=0.031inch
R13: library part RT0603BRD0722KL, "RES SMD 22K OHM 0.1% 1/10W 0603", Case Code (Imperial)=0603, Case Code (Metric)=1608, LCSC Part Number=C469656, Manufacturer=Yageo, Max Operating Temperature=155°C, Max Power Dissipation=100mW, Min Operating Temperature=-55°C, Resistance=22kR, Resistor Type="Thin Film", Supplier Part Number 1=3017560, Temperature Coefficient=25ppm/°C, Tolerance=0.1%, Voltage Rating=75V, Voltage Rating (DC)=50V, Case/Package=0603, Category="Chip SMD Resistors", ComponentLink1Description=https://datasheet.ciiva.com/12836/pyu-rt-1-to-0-05-rohs-l-4-12836650.pdf?src-supplier=Mouser, ComponentLink1URL=https://datasheet.ciiva.com/12836/pyu-rt-1-to-0-05-rohs-l-4-12836650.pdf?src-supplier=Mouser, Contact Plating=Tin,Lead, Features="Moisture Resistant", Height=0.022inch, Item Type=Resistor, Lead Free="Lead Free", Length=0.063inch, Manufacturer Part Number=RT0603BRD0722KL, Number of Terminations=2, Packaging="Tape and Reel", Power Rating=100mW, Pricing 1="5000=0.02230, 15000=0.02150, 25000=0.02110, 50000=0.02060, 100000=0.01990 (USD)", RoHS=Yes, RoHS Compliant=Yes, Series=RT, Stock 1=75005, Supplier 1="Future Electronics", Termination=SMD/SMT, Weight=7.1E-05oz, Width=0.031inch
R14: library part 3296W-1-504, "Res Cermet Trimmer 500K Ohm 10% 1/2W 25(Elec)Turn", LCSC Part Number=C330437, Manufacturer="BOCHEN(Chengdu Guosheng Tech)", ComponentLink1Description=LCSC, ComponentLink1URL=https://www.lcsc.com/product-detail/Variable-Resistors-Potentiometers_BOCHEN-Chengdu-Guosheng-Tech-3296W-1-504_C330437.html, Item Type=Potentiometer, Manufacturer Part Number=3296W-1-504
R15 R16: library part RT0603BRD071K8L, "RES SMD 1.8K OHM 0.1% 1/10W 0603", Case Code (Imperial)=0603, Case Code (Metric)=1608, LCSC Part Number=C705745, Manufacturer=Yageo, Max Operating Temperature=125°C, Max Power Dissipation=100mW, Min Operating Temperature=-55°C, Package Quantity=5000, Resistance=1.8kR, Resistor Type="Thin Film", Supplier Part Number 1=1991446P, Temperature Coefficient=25ppm/°C, Tolerance=0.1%, Voltage Rating=75V, Voltage Rating (DC)=50V, Case/Package=0603, Category="Chip SMD Resistors", ComponentLink1Description=https://datasheet.ciiva.com/12694/pyu-rt-1-to-0-05-rohs-l-4-12694842.pdf?src-supplier=Mouser, ComponentLink1URL=https://datasheet.ciiva.com/12694/pyu-rt-1-to-0-05-rohs-l-4-12694842.pdf?src-supplier=Mouser, ComponentLink2Description=https://datasheet.ciiva.com/2585/pyu-rt-1-to-0-05-rohs-l-4-2585762.pdf?src-supplier=Digi-Key, ComponentLink2URL=https://datasheet.ciiva.com/2585/pyu-rt-1-to-0-05-rohs-l-4-2585762.pdf?src-supplier=Digi-Key, Construction=Rectangular, Contact Plating=Tin,Matte, Depth=0.8mm, Features="Moisture Resistant", Height=0.022inch, Item Type=Resistor, Lead Free="Lead Free", Length=0.063inch, Manufacturer Part Number=RT0603BRD071K8L, Military Standard=Not, Number of Terminations=2, Packaging="Tape and Reel", Power Rating=100mW, Pricing 1="100=0.21900, 250=0.20400, 500=0.19000, 1000=0.17400 (GBP)", Radiation Hardening=No, RoHS=Yes, RoHS Compliant=Yes, Series=RT, Stock 1=3210, Supplier 1=Rs, Termination=SMD/SMT, Width=0.031inch
R17: library part RT0603BRE07270RL, "RES SMD 270 OHM 0.1% 1/10W 0603", Case/Package=0603, LCSC Part Number=C705836, Manufacturer=Yageo, Max Operating Temperature=125°C, Max Power Dissipation=100mW, Min Operating Temperature=-55°C, Package Quantity=5000, Resistor Type="Thin Film", Supplier Part Number 1=RT0603BRE07270RL-ND, Temperature Coefficient=50ppm/°C, Tolerance=0.1%, Voltage Rating (DC)=50V, Category="Chip SMD Resistors", ComponentLink1Description=https://datasheet.ciiva.com/2584/pyu-rt-1-to-0-05-rohs-l-5-2584379.pdf?src-supplier=Digi-Key, ComponentLink1URL=https://datasheet.ciiva.com/2584/pyu-rt-1-to-0-05-rohs-l-5-2584379.pdf?src-supplier=Digi-Key, Construction=Rectangular, Depth=0.8mm, Height=0.022inch, Item Type=Resistor, Lead Free="Lead Free", Length=0.063inch, Manufacturer Part Number=RT0603BRE07270RL, Military Standard=Not, Number of Terminations=2, Packaging="Tape and Reel", Pricing 1="5000=0.04770 (USD)", Resistance=270R, RoHS=Yes, RoHS Compliant=Yes, Series=RT, Supplier 1=Digi-Key, Width=0.031inch
R18 R19: library part ARG03FTC8002N, "±1% 80kΩ 0603 Chip Resistor - Surface Mount ROHS", LCSC Part Number=C3014409, Manufacturer="Viking Tech", ComponentLink1Description=LCSC, ComponentLink1URL=https://www.lcsc.com/product-detail/Chip-Resistor-Surface-Mount_Viking-Tech-ARG03FTC8002N_C3014409.html, Item Type=Resistor, Manufacturer Part Number=ARG03FTC8002N
R20 R21 R49: library part AR05BTC4002, "±0.1% 40kΩ 0805 Chip Resistor - Surface Mount ROHS", LCSC Part Number=C5266069, Manufacturer="Viking Tech", ComponentLink1Description=LCSC, ComponentLink1URL=https://www.lcsc.com/product-detail/Chip-Resistor-Surface-Mount_Viking-Tech-AR05BTC4002_C5266069.html, Item Type=Resistor, Manufacturer Part Number=AR05BTC4002
R22 R23: library part ARG02BTC2702, "±25ppm/℃ ±0.1% 27kΩ 0402 Chip Resistor - Surface Mount ROHS", LCSC Part Number=C5266105, Manufacturer="Viking Tech", ComponentLink1Description=LCSC, ComponentLink1URL=https://www.lcsc.com/product-detail/Chip-Resistor-Surface-Mount_Viking-Tech-ARG02BTC2702_C5266105.html, Item Type=Resistor, Manufacturer Part Number=ARG02BTC2702
R24 R25 R50: library part AR03BTCX2002, "100mW ±25ppm/℃ ±0.1% 20kΩ 0603 Chip Resistor - Surface Mount ROHS", LCSC Part Number=C319766, Manufacturer="Viking Tech", ComponentLink1Description=LCSC, ComponentLink1URL=https://www.lcsc.com/product-detail/Chip-Resistor-Surface-Mount_Viking-Tech-AR03BTCX2002_C319766.html, Item Type=Resistor, Manufacturer Part Number=AR03BTCX2002
R26 R27: library part RC0603DR-0716KL, "RES 16K OHM 0.5% 1/10W 0603", Case/Package=0603, LCSC Part Number=C327136, Manufacturer=Yageo, Max Operating Temperature=155°C, Max Power Dissipation=100mW, Min Operating Temperature=-55°C, Resistance=16kR, Resistor Type="Thick Film", Temperature Coefficient=100ppm/°C, Tolerance=0.5%, Category="Chip SMD Resistors", ComponentLink1Description=http://www.yageo.com.tw/exep/pages/download/literatures/PYu-R_INT-thick_7.pdf?src-supplier=Digi-Key, ComponentLink1URL=http://www.yageo.com.tw/exep/pages/download/literatures/PYu-R_INT-thick_7.pdf?src-supplier=Digi-Key, Features="Moisture Resistant", Height=0.022inch, Item Type=Resistor, Length=0.063inch, Manufacturer Part Number=RC0603DR-0716KL, Number of Terminations=2, Packaging="Tape and Reel", Pricing 1="5000=0.00430, 10000=0.00424, 20000=0.00411 (USD)", RoHS=Yes, RoHS Compliant=Yes, Supplier 1=Avnet, Supplier Part Number 1=RC0603DR-0716KL, Width=0.031inch
R28 R29 R53: library part RT0603BRD078K2L, "RES SMD 8.2K OHM 0.1% 1/10W 0603", Case/Package=0603, LCSC Part Number=C861589, Manufacturer=Yageo, Max Operating Temperature=155°C, Min Operating Temperature=-55°C, Package Height=0.45mm, Package Length=1.6mm, Package Style=SMTMeter, Package Width=0.8mm, Power=100mW, Rated Temperature=70°C, Resistor Type="FIXED RESISTOR", Supplier Part Number 1=1991627P, Temperature Coefficient=25ppm/°C, Tolerance=0.1%, Working Voltage=75V, Category="Chip SMD Resistors", ComponentLink1Description=https://datasheet.ciiva.com:443/pdfs/VipMasterIC/IC/YAGO/YAGO-S-A0008510989/YAGO-S-A0008510989-1.pdf?src-supplier=IHS+Markit, ComponentLink1URL=https://datasheet.ciiva.com:443/pdfs/VipMasterIC/IC/YAGO/YAGO-S-A0008510989/YAGO-S-A0008510989-1.pdf?src-supplier=IHS+Markit, ComponentLink2Description=https://datasheet.ciiva.com/12809/pyu-rt-1-to-0-05-rohs-l-4-12809820.pdf?src-supplier=Mouser, ComponentLink2URL=https://datasheet.ciiva.com/12809/pyu-rt-1-to-0-05-rohs-l-4-12809820.pdf?src-supplier=Mouser, Construction=Chip, Item Type=Resistor, Manufacturer Part Number=RT0603BRD078K2L, Mounting Technology="Surface Mount", Packaging="Tape and Reel", Pins=2, Pricing 1="100=0.21900, 250=0.20400, 500=0.19000, 1000=0.17400 (GBP)", Reach SVHC Compliant=Yes, RoHS=Yes, RoHS Compliant=Yes, Stock 1=4900, Supplier 1=Rs, Technology="THIN FILM", Termination=Wraparound
R30 R31 R55: library part RC0402FR-074K02L, "RES 4.02K OHM 1% 1/16W 0402", Case Code (Imperial)=0402, Case Code (Metric)=1005, LCSC Part Number=C137968, Manufacturer=Yageo, Max Operating Temperature=155°C, Max Power Dissipation=63mW, Min Operating Temperature=-55°C, Package Quantity=1, Power Rating=62.5mW, Resistance=4.02kR, Resistor Type="Thick Film", Supplier Part Number 1=603-RC0402FR-074K02L, Temperature Coefficient=100ppm/°C, Tolerance=1%, Voltage Rating=50V, Case/Package=0402, Category="Chip SMD Resistors", ComponentLink1Description=https://datasheet.ciiva.com/2553/pyu-r-int-thick-7-2553258.pdf?src-supplier=Digi-Key, ComponentLink1URL=https://datasheet.ciiva.com/2553/pyu-r-int-thick-7-2553258.pdf?src-supplier=Digi-Key, ComponentLink2Description=https://datasheet.ciiva.com/2553/pyu-r-int-thick-7-2553259.pdf?src-supplier=Digi-Key, ComponentLink2URL=https://datasheet.ciiva.com/2553/pyu-r-int-thick-7-2553259.pdf?src-supplier=Digi-Key, ComponentLink3Description=https://datasheet.ciiva.com/2553/pyu-r-int-thick-7-2553257.pdf?src-supplier=Digi-Key, ComponentLink3URL=https://datasheet.ciiva.com/2553/pyu-r-int-thick-7-2553257.pdf?src-supplier=Digi-Key, ComponentLink4Description=https://datasheet.ciiva.com/12668/pyu-rc0402-51-rohs-l-6-r-12668204.pdf?src-supplier=Mouser, ComponentLink4URL=https://datasheet.ciiva.com/12668/pyu-rc0402-51-rohs-l-6-r-12668204.pdf?src-supplier=Mouser, ComponentLink5Description=https://datasheet.ciiva.com/16741/pyu-rc0402-51-rohs-l-6-r-16741438.pdf?src-supplier=Future+Electronics, ComponentLink5URL=https://datasheet.ciiva.com/16741/pyu-rc0402-51-rohs-l-6-r-16741438.pdf?src-supplier=Future+Electronics, Construction=Rectangular, Contact Plating=Tin,Matte, Depth=0.5mm, Features="Moisture Resistant", Height=0.016inch, Lead Free="Lead Free", Length=1mm, Manufacturer Part Number=RC0402FR-074K02L, Military Standard=Not, Number of Terminations=2, Packaging="Tape and Reel", Pricing 1="1=0.10000, 10=0.01200, 50=0.01200, 100=0.00500, 1000=0.00300, 2500=0.00200, 10000=0.00100 (USD)", RoHS=Yes, RoHS Compliant=Yes, Series=RC, Stock 1=302754, Supplier 1=Mouser, Technology="THICK FILM", Termination=SMD/SMT, Width=0.02inch, Working Voltage=50V
R32 R33: library part RC0603FR-072K7L, "RES 2.7K OHM 1% 1/10W 0603", Case Code (Imperial)=0603, Case Code (Metric)=1608, LCSC Part Number=C114612, Manufacturer=Yageo, Max Operating Temperature=155°C, Max Power Dissipation=100mW, Min Operating Temperature=-55°C, Package Quantity=1, Resistance=2.7kR, Resistance Tolerance=1%, Resistor Type="Thick Film", Temperature Coefficient=100ppm/°C, Voltage Rating=50V, Case/Package=0603, Category="Chip SMD Resistors", Construction=Rectangular, Depth=0.8mm, Features="Moisture Resistant", Height=0.022inch, Item Type=Resistor, Lead Free="Lead Free", Length=0.063inch, Manufacturer Part Number=RC0603FR-072K7L, Military Standard=Not, Number of Pins=2, Number of Terminations=2, Packaging="Tape and Reel", Power Rating=100mW, Pricing 1="5000=0.00133, 10000=0.00131, 20000=0.00127 (USD)", Reach SVHC Compliant=Yes, RoHS=Yes, RoHS Compliant=Yes, Series=RC, Size Code=0603, Stock 1=5000, Supplier 1=Avnet, Supplier Part Number 1=RC0603FR-072K7L, Termination=SMD/SMT, Tolerance=1%, Voltage Rating (DC)=50V, Width=0.031inch
R34 R35 R56: library part AR03BTCX2001, "100mW ±25ppm/℃ ±0.1% 2kΩ 0603 Chip Resistor - Surface Mount ROHS", LCSC Part Number=C318130, Manufacturer="Viking Tech", ComponentLink1Description=LCSC, ComponentLink1URL=https://www.lcsc.com/product-detail/Chip-Resistor-Surface-Mount_Viking-Tech-AR03BTCX2001_C318130.html, Item Type=Resistor, Manufacturer Part Number=AR03BTCX2001
R36 R37: library part RT0402BRD071K6L, "RES SMD 1.6K OHM 0.1% 1/16W 0402", Case Code (Imperial)=0402, Case Code (Metric)=1005, LCSC Part Number=C852616, Manufacturer=Yageo, Max Operating Temperature=125°C, Max Power Dissipation=63mW, Min Operating Temperature=-55°C, Package Quantity=10000, Power Rating=62.5mW, Resistance=1.6kR, Resistor Type="Thin Film", Supplier Part Number 1=YAG4199CT-ND, Temperature Coefficient=25ppm/°C, Tolerance=0.1%, Voltage Rating=50V, Case/Package=0402, Category="Chip SMD Resistors", ComponentLink1Description=https://datasheet.ciiva.com/2582/pyu-rt-1-to-0-05-rohs-l-5-2582211.pdf?src-supplier=Digi-Key, ComponentLink1URL=https://datasheet.ciiva.com/2582/pyu-rt-1-to-0-05-rohs-l-5-2582211.pdf?src-supplier=Digi-Key, Height=0.014inch, Item Type=Resistor, Lead Free="Lead Free", Length=0.039inch, Manufacturer Part Number=RT0402BRD071K6L, Number of Terminations=2, Packaging="Tape and Reel", Pricing 1="1=0.40000, 10=0.33600, 100=0.13130, 500=0.07938, 1000=0.05496, 2500=0.05038, 5000=0.04580 (USD)", RoHS=Yes, RoHS Compliant=Yes, Series=RT, Stock 1=20555, Supplier 1=Digi-Key, Termination=SMD/SMT, Voltage Rating (DC)=50V, Weight=2.3E-05oz, Width=0.5mm
R38 R39 R57: library part AR03BTCX1301, "100mW ±25ppm/℃ ±0.1% 1.3kΩ 0603 Chip Resistor - Surface Mount ROHS", LCSC Part Number=C2984321, Manufacturer="Viking Tech", ComponentLink1Description=LCSC, ComponentLink1URL=https://www.lcsc.com/product-detail/Chip-Resistor-Surface-Mount_Viking-Tech-AR03BTCX1301_C2984321.html, Item Type=Resistor, Manufacturer Part Number=AR03BTCX1301